# Altium PCB BOARD_4LAYER.PcbDoc (part 14 of 21)
Units mil, origin at the board's own origin, x right, y up, seen from the top; angles counter-clockwise.
Board outline 6692.91 x 10039.37 mil, 4 copper layers (Top Layer, Mid Layer 1, Mid Layer 2, Bottom Layer), stack 66.299 mil thick; 1532 components, 908 nets, 4105 pads, 1286 vias.
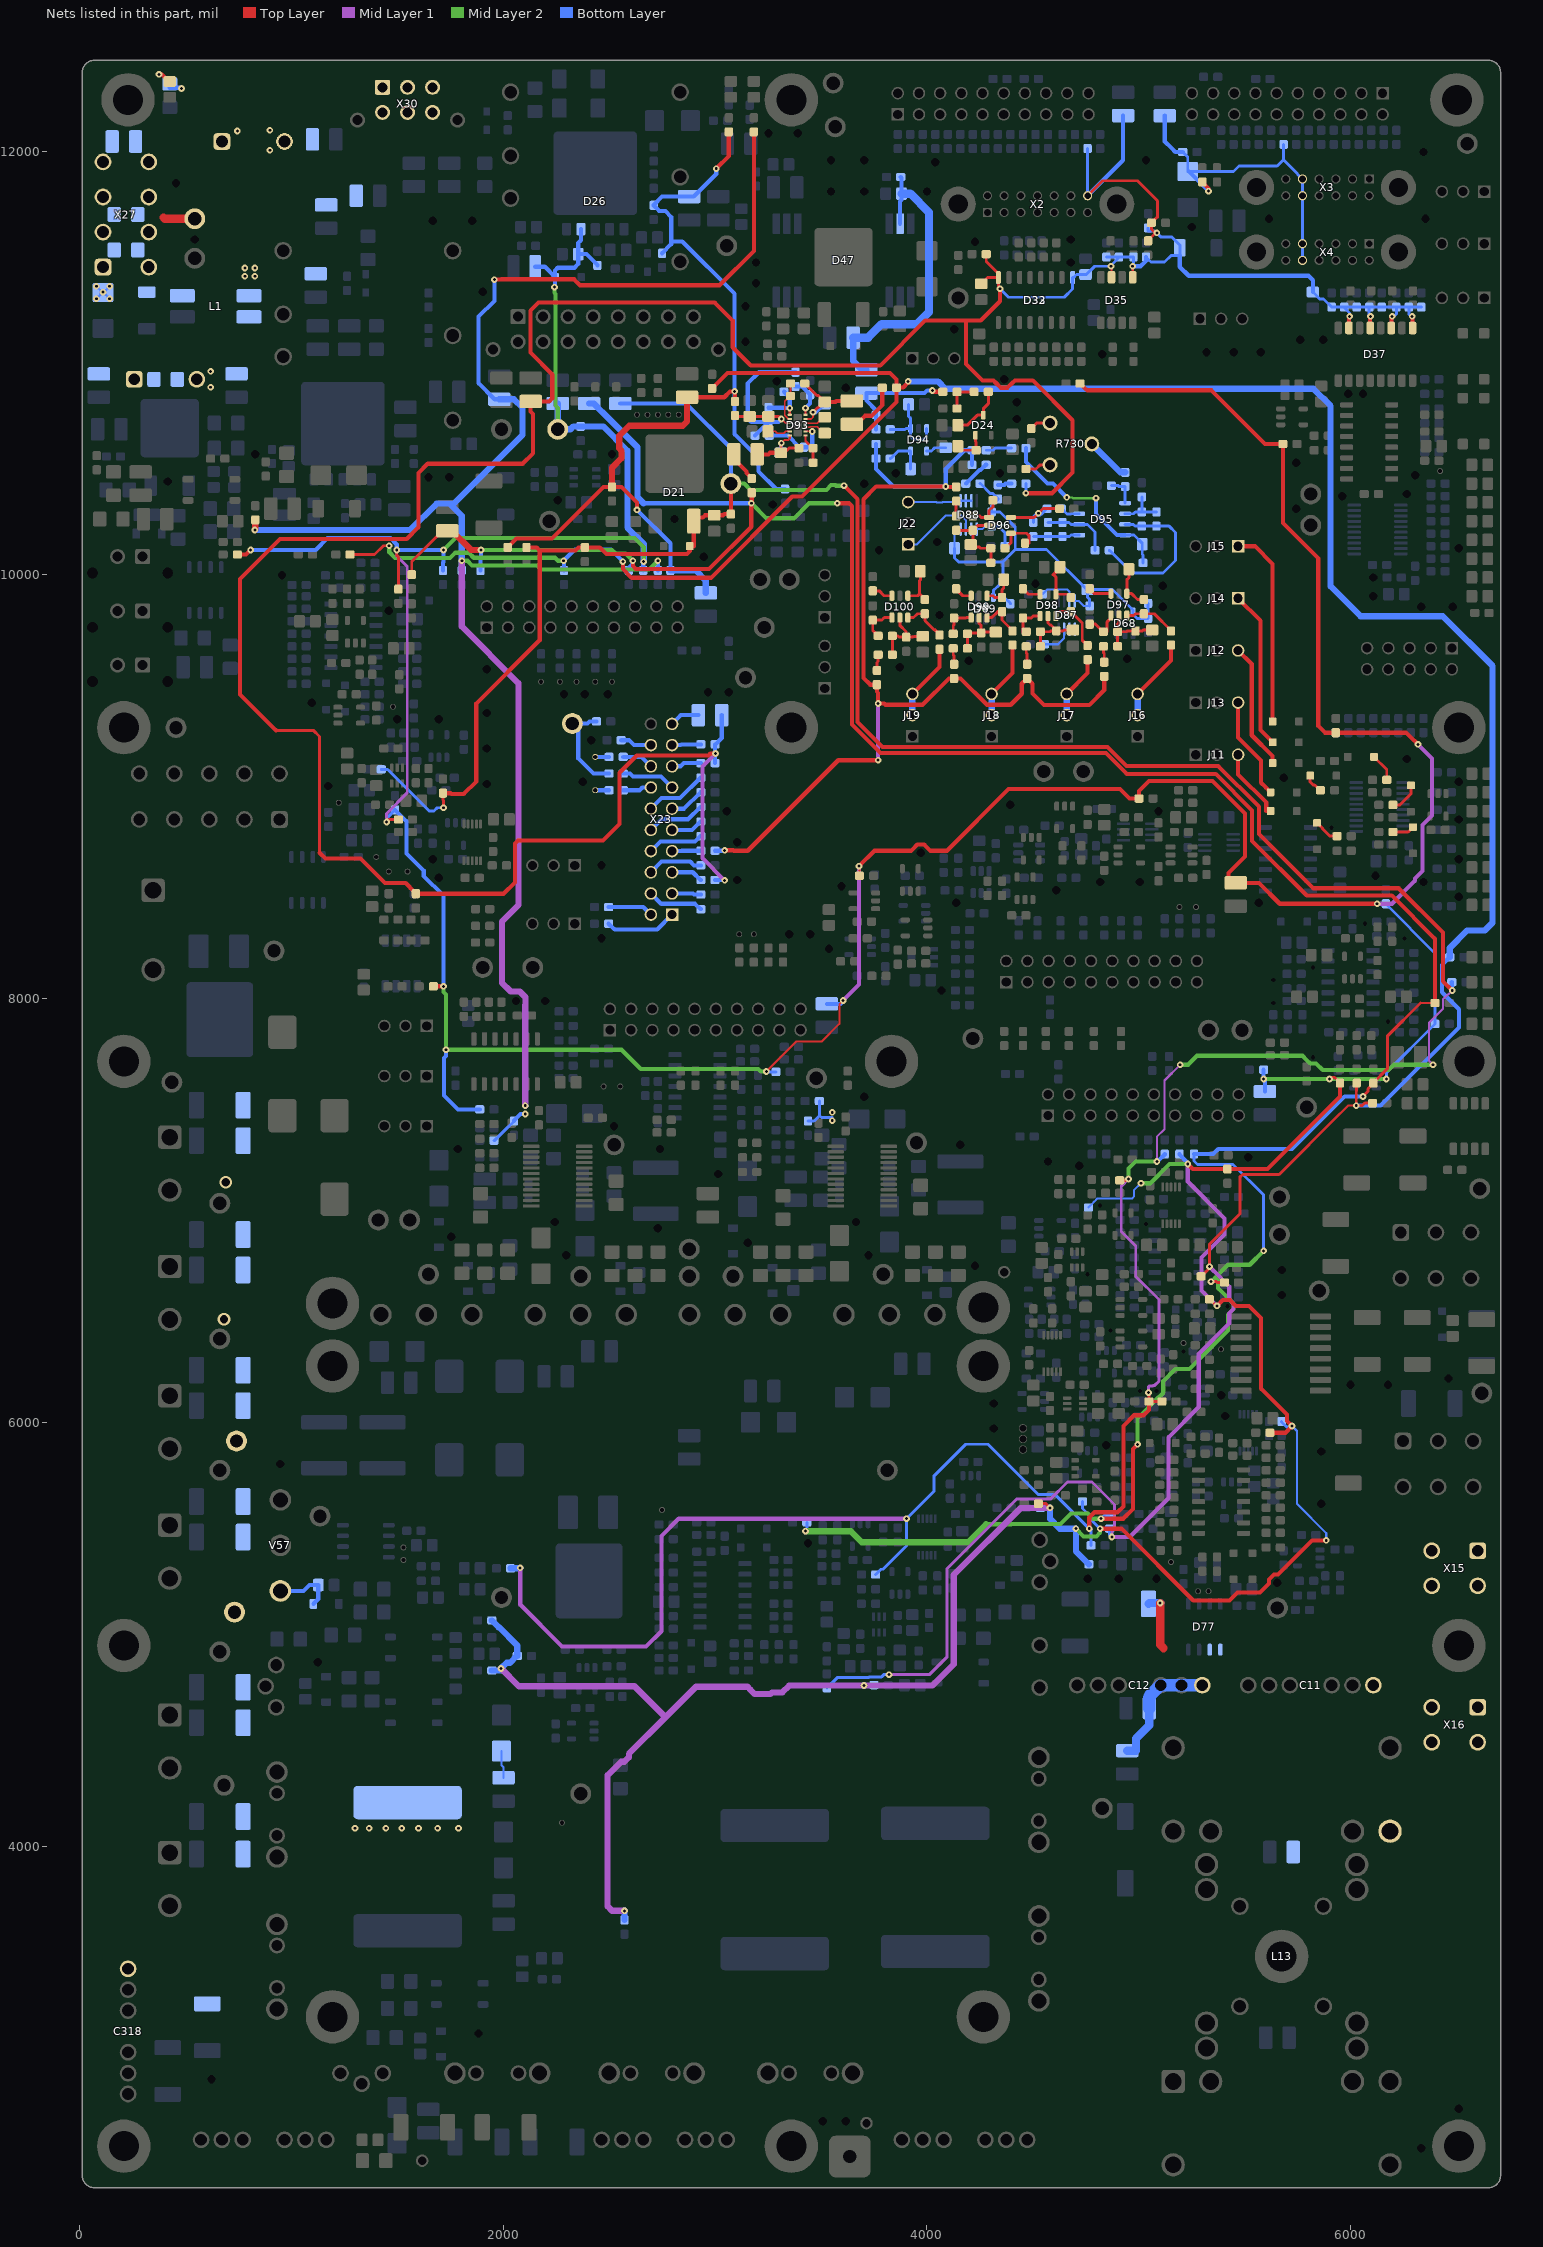
[diagram p16: the nets of this part, all layers, seen from the top]

## Via types
v1: diameter 27.56/31.5/31.5/27.56 (per signal layer), hole 13.78, Top Layer to Bottom Layer, 1270 vias
v2: diameter 59.06, hole 39.37, Top Layer to Bottom Layer, 16 vias

## Nets (pads, with @x,y where several pads share a name; then routed paths per layer and width w, separated by ;. In a path a pad name is that pad's centre, name@x,y a point inside that pad or via, vN(x,y) a via of type N, cw(c..) or ccw(c..) an arc to the next point about the centre after c; other vN are vias at no path point) (continued)
$7N3917: R101.2 V65.1 | length 103.9
  Top Layer w13.78: R101.2@6198.82,8787.4 6270.67,8787.4 V65.1@6293.31,8810.04
$7N3919: R102.2 V66.1 | length 94.1
  Top Layer w13.78: V66.1@5808.07,9053.15 5808.07,9023.54 5822.27,9009.34 5829.24,9009.34 5854.33,8984.25 R102.2@5856.3,8984.25
$7N3921: R103.2 V67.1 | length 121.9
  Top Layer w13.78: V67.1@5840.55,8829.72 5841.54,8829.72 5867.15,8804.11 5867.15,8801.16 5900.59,8767.72 R103.2@5935.04,8767.72
$7N3923: R104.2 V68.1 | length 145.7
  Top Layer w13.78: R104.2@6198.82,8915.35 6231.38,8915.35 6283.46,8967.44 V68.1@6283.46,9006.89
$7N3925: R105.2 V69.1 | length 133.1
  Top Layer w13.78: V69.1@6109.25,9141.73 6169.29,9081.69 R105.2@6169.29,9033.46
$7N4019: J15.1 V74.1 | length 940.5
  Top Layer w19.68: J15.1@5468.11,10135.83 5547.12,10135.83 5630.91,10052.04 V74.1@5630.91,9309.06
$7N4021: J14.1 V73.1 | length 746.6
  Top Layer w19.68: J14.1@5468.11,9889.76 5573.62,9784.25 5573.62,9268.9 5630.91,9211.61 V73.1@5630.91,9210.63
$7N4028: J13.3 V72.1 | length 486.6
  Top Layer w19.68: J13.3@5468.11,9397.64 5468.11,9233.32 5576.8,9124.63 5576.8,9019.66 5596.79,8999.67 5596.79,8998.68 V72.1@5621.06,8974.41
$7N4030: J12.3 V71.1 | length 598.9
  Top Layer w19.68: J12.3@5468.11,9643.7 5532.23,9579.58 5532.23,9243.88 5630.91,9145.2 V71.1@5630.91,9112.2
$7N4032: J11.3 V70.1 | length 340.8
  Top Layer w19.68: J11.3@5468.11,9151.57 5468.11,9059.22 5601.14,8926.2 5601.14,8885.83 V70.1@5621.06,8885.83
$8N34: D93.2 R724.2 R727.1 | length 193.1
  Top Layer w5.91: D93.2@3352.36,10736.22 3345.91,10736.22 3329.15,10752.98 3329.15,10819.31 3354.33,10844.49 R724.2@3356.3,10844.49
  Top Layer w7.87: R724.2@3356.3,10844.49 R727.1@3356.3,10903.54
$8N46: D93.7 R725.1 R726.2 | length 143.8
  Top Layer w10: D93.7@3427.17,10657.48 3427.17,10631.89 3460.63,10598.43 R726.2@3462.6,10598.43
  Top Layer w13.78: R725.1@3462.6,10529.53 R726.2@3462.6,10598.43
$8N62: C144.2 C145.2 D93.11 R558.2 R727.2 | length 468.9
  Top Layer w7.87: D93.11@3427.17,10736.22 3454.23,10736.22 3462.6,10744.59 v1(3462.6,10767.72)
  Top Layer w13.78: R727.2@3423.23,10903.54 3480.29,10846.48 3488.17,10846.48 C144.2@3517.72,10816.93 3513.78,10816.93 3484.23,10787.38 3482.26,10787.38 v1(3462.6,10767.72)
  Top Layer w19.68: C144.2@3517.72,10816.93 3567.91,10816.93 3571.85,10820.87 R558.2@3645.67,10820.87
  Bottom Layer w19.68: v1(3462.6,10767.72) 3474.41,10767.72 3513.78,10807.09 C145.2@3517.72,10807.09
$8N66: C147.1 C148.1 D93.6 R559.2 R726.1 | length 363.4
  Top Layer w10: v1@3311.02,10620.08 v1(3312.99,10622.05) 3327.23,10636.28 3344.94,10636.28 3352.36,10643.7 D93.6@3352.36,10657.48
  Top Layer w13.78: v1@3311.02,10620.08 C147.1@3311.02,10576.77 3327,10576.77 3348.66,10598.43 R726.1@3395.67,10598.43
  Top Layer w19.68: R559.2@3198.82,10568.9 3251.97,10568.9 3259.84,10576.77 C147.1@3311.02,10576.77
  Bottom Layer w19.68: C148.1@3311.02,10576.77 3311.02,10620.08 v1(3312.99,10622.05)
$8N130: FB77.1 R558.1 | length 263.2
  Top Layer w19.68: R558.1@3645.67,10710.63 3667.32,10710.63 3707.65,10750.96 3737.94,10750.96 3789.37,10802.39 FB77.1@3789.37,10883.86
$8N150: FB78.1 R559.1 | length 149.2
  Top Layer w19.68: R559.1@3088.58,10568.9 3088.58,10547.24 3148.14,10487.69 3148.14,10481.78 3173.23,10456.69 FB78.1@3173.23,10454.72
$8N169: C146.2 C195.1 D93.3 FB79.2 R379.2 R380.2 R381.2 | length 947
  Top Layer w5.91: 3301.18,10748.03 v1(3312.99,10736.22) 3329,10720.21 3329.52,10720.21 3333.2,10716.54 D93.3@3352.36,10716.54
  Top Layer w13.78: FB79.2@3094.49,10751.97 3098.43,10748.03 C146.2@3163.39,10748.03 C195.1@3251.97,10748.03 3301.18,10748.03
  Bottom Layer w19.68: R379.2@3188.98,10657.48 3251.97,10720.47 R381.2@3251.97,10722.44 ; v1(3312.99,10736.22) 3299.21,10722.44 R381.2@3251.97,10722.44 ; R380.2@3379.92,10956.69 3208.02,10956.69 3154.01,10902.68 3154.01,10739.18 3170.75,10722.44 R381.2@3251.97,10722.44
$8N183: C267.2 D93.9 | length 104.4
  Top Layer w5.91: D93.9@3427.17,10696.85 3446.33,10696.85 3449.28,10699.8 3483.27,10699.8 3513.78,10669.29 C267.2@3517.72,10669.29
$8N185: C267.1 D93.10 | length 102
  Top Layer w7.87: D93.10@3427.17,10716.54 3482.24,10716.54 3509.8,10744.09 C267.1@3517.72,10744.09
$8N194: C326.2 D93.5 | length 109.6
  Top Layer w5.91: C326.2@3250,10677.17 3283.72,10677.17 3292.47,10668.41 3324.44,10668.41 3333.2,10677.17 D93.5@3352.36,10677.17
$8N233: D93.1 R381.1 R537.2 | length 222
  Top Layer w10: D93.1@3352.36,10755.91 v1(3352.36,10787.4)
  Bottom Layer w19.68: R381.1@3251.97,10789.37 3325.71,10789.37 3327.68,10787.4 v1(3352.36,10787.4) 3352.36,10838.58 3326.77,10864.17 R537.2@3324.8,10864.17
$8N264: D93.12 R380.1 R538.2 | length 189.8
  Top Layer w10: D93.12@3427.17,10755.91 v1(3427.17,10787.4)
  Bottom Layer w19.68: R380.1@3379.92,10889.76 3411.42,10889.76 3448.82,10852.36 R538.2@3448.82,10850.39 3448.82,10809.06 v1(3427.17,10787.4)
$8N266: D93.8 R379.1 R539.2 | length 324.6
  Top Layer w5.91: D93.8@3427.17,10677.17 v1(3458.66,10677.17)
  Bottom Layer w19.68: R379.1@3255.91,10657.48 3343.95,10657.48 3399.07,10602.36 R539.2@3419.29,10602.36 3446.27,10602.36 3458.66,10614.75 v1(3458.66,10677.17)
$8N331: C149.2 D94.1 D94.3 FB49.2 | length 376.9
  Bottom Layer w13.78: FB49.2@3826.77,10687.01 3896.57,10687.01 3900.51,10690.94 D94.1@3923.23,10690.94 ; C149.2@3913.39,10805.12 3913.39,10749.02 3923.23,10739.17 D94.1@3923.23,10690.94 ; D94.3@3998.03,10690.94 3998.03,10653.82 3984.11,10639.9 3937.15,10639.9 3923.23,10653.82 D94.1@3923.23,10690.94
$8N334: C150.2 D94.5 FB50.1 | length 195.8
  Bottom Layer w13.78: FB50.1@3826.77,10549.21 3828.74,10549.21 3864.17,10584.65 D94.5@3923.23,10584.65 C150.2@3923.23,10500
$8N349: C327.2 D94.4 | length 97.1
  Bottom Layer w13.78: D94.4@3998.03,10584.65 4020.75,10584.65 4036.5,10600.39 C327.2@4088.58,10600.39
$8N391: C84.2 FB49.1 FB51.2 L12.2 | length 557.6
  Top Layer w19.68: v1(4025.59,10870.08) 4031.5,10864.17 FB51.2@4074.8,10864.17
  Bottom Layer w19.68: FB49.1@3759.84,10687.01 C84.2@3759.84,10755.91 3759.84,10777.26 3714.57,10822.53 L12.2@3714.57,10858.27 3989.09,10858.27 4000.91,10870.08 v1(4025.59,10870.08)
$8N428: C198.1 D24.1 R208.2 | length 178.8
  Top Layer w13.78: C198.1@4145.67,10608.27 4145.67,10588.58 R208.2@4232.28,10588.58 4232.28,10624.92 4228.35,10628.86 D24.1@4228.35,10659.45
$8N429: C151.2 D24.3 R209.1 | length 259.7
  Top Layer w13.78: C151.2@4145.67,10706.69 4190.22,10706.69 4237.46,10753.94 D24.3@4265.75,10753.94 4265.75,10784.53 4289.37,10808.15 R209.1@4289.37,10864.17
$8N430: C85.2 FB51.1 R209.2 | length 159.4
  Top Layer w13.78: C85.2@4141.73,10785.43 FB51.1@4141.73,10864.17 R209.2@4222.44,10864.17
$8N589: C328.2 D95.6 R384.2 R385.1 | length 221.9
  Bottom Layer w13.78: D95.6@4935.04,10288.98 4974.92,10288.98 4983.19,10297.24 R385.1@5013.78,10297.24 ; R384.2@5013.78,10368.11 R385.1@5013.78,10297.24 ; C328.2@5082.68,10297.24 R385.1@5013.78,10297.24
$8N592: C328.1 D95.7 R385.2 R732.1 | length 766.9
  Bottom Layer w13.78: R732.1@4860.24,10116.14 4862.2,10116.14 4969.08,10009.27 5113.61,10009.27 5173,10068.66 5173,10200 5142.69,10230.32 C328.1@5082.68,10230.32 R385.2@5013.78,10230.32 4983.19,10230.32 4974.92,10238.58 D95.7@4935.04,10238.58
$8N594: R383.2 R730.3 | length 122.3
  Top Layer w13.78: R383.2@4466.54,10500 4514.69,10500 4534.37,10519.69 R730.3@4580.71,10519.68
$8N612: R386.1 R730.2 | length 212.9
  Bottom Layer w29.53: R730.2@4777.56,10618.11 4911.42,10484.25 R386.1@4935.04,10484.25
$8N614: C86.2 D95.5 R386.2 | length 145.8
  Bottom Layer w13.78: C86.2@4870.08,10421.26 4902.64,10421.26 4904.45,10419.45 4904.45,10417.32 R386.2@4935.04,10417.32 D95.5@4935.04,10339.37
$8N619: R382.1 R730.1 | length 99.2
  Top Layer w13.78: R382.1@4492.13,10690.94 4517.72,10716.54 R730.1@4580.71,10716.54
$8N649: C87.2 C152.2 D95.8 R210.2 | length 911.3
  Mid Layer 2 w10: v1(4659.45,10366.14) 4686.1,10366.14 4690.04,10362.2 v1(4797.24,10362.2)
  Bottom Layer w13.78: D95.8@4935.04,10188.19 4977.17,10188.19 5015.75,10149.61 C152.2@5015.75,10145.67 5015.75,10098.43 5019.69,10094.49 C87.2@5019.69,10057.09
  Bottom Layer w19.68: R210.2@4466.54,10598.43 4466.54,10533.67 4569.11,10431.1 4594.49,10431.1 v1(4659.45,10366.14) ; v1(4797.24,10362.2) 4797.24,10286.93 4895.98,10188.19 D95.8@4935.04,10188.19
$8N671: FB52.1 R210.1 | length 124.3
  Bottom Layer w13.78: FB52.1@4279.53,10588.58 4312.09,10588.58 4322.08,10598.58 4366.9,10598.58 4367.05,10598.43 R210.1@4399.61,10598.43
$8N719: C329.2 D95.2 R731.1 R732.2 | length 328.1
  Bottom Layer w13.78: C329.2@4570.87,10248.03 R731.1@4639.76,10248.03 4670.35,10248.03 4679.45,10238.94 4679.45,10238.58 D95.2@4718.5,10238.58 4757.56,10238.58 4793.31,10202.83 R732.2@4793.31,10116.14
$8N721: D95.3 R121.1 | length 95.5
  Bottom Layer w13.78: R121.1@4633.86,10312.99 4635.83,10312.99 4660.92,10287.9 4678.37,10287.9 4679.45,10288.98 D95.3@4718.5,10288.98
$8N726: C329.1 D95.1 R731.2 R734.1 | length 219.5
  Bottom Layer w13.78: R734.1@4501.97,10181.1 C329.1@4570.87,10181.1 R731.2@4639.76,10181.1 4672.36,10181.1 4679.45,10188.19 D95.1@4718.5,10188.19
$8N730: D96.3 R121.2 R733.2 R734.2 | length 367.5
  Top Layer w13.78: D96.3@4396.06,10271.65 4505.91,10271.65 v1(4525.59,10291.34) 4547.24,10312.99 R733.2@4625.98,10312.99
  Bottom Layer w13.78: R734.2@4501.97,10248.03 4501.97,10275.41 4509.04,10282.48 v1@4534.45,10282.48 ; v1(4525.59,10291.34) v1@4534.45,10282.48 ; R121.2@4566.93,10312.99 4541.84,10287.9 4539.87,10287.9 v1@4534.45,10282.48
$8N738: FB53.1 R211.1 | length 70.9
  Top Layer w13.78: R211.1@4137.8,10277.56 FB53.1@4137.8,10348.43
$8N739: C88.2 C153.2 D96.5 R211.2 R306.2 R713.1 | length 413.2
  Top Layer w13.78: R211.2@4137.8,10210.63 R713.1@4216.54,10210.63 ; D96.5@4292.91,10234.25 4240.16,10234.25 R713.1@4216.54,10210.63 ; C88.2@4301.18,10057.09 R306.2@4301.18,10125.98 4253.55,10125.98 4247.13,10132.41 4206.69,10132.41 C153.2@4206.69,10143.7 4216.54,10153.54 R713.1@4216.54,10210.63
$8N764: D96.1 R122.1 R306.1 | length 229.4
  Top Layer w13.78: R306.1@4368.11,10125.98 4370.08,10125.98 4396.06,10151.97 D96.1@4396.06,10196.85 4470.18,10196.85 4482.14,10184.89 4482.14,10149.61 R122.1@4462.6,10149.61
$8N798: D96.4 R713.2 R735.2 | length 167
  Top Layer w13.78: R713.2@4216.54,10277.56 4249.02,10277.56 4254.92,10271.65 D96.4@4292.91,10271.65 4292.91,10303.66 4311.02,10321.77 R735.2@4311.02,10352.36
$8N882: D97.3 R742.2 | length 110
  Top Layer w13.78: R742.2@4767.72,9935.04 4790.94,9911.81 D97.3@4868.11,9911.81
$8N885: C268.2 D97.1 R741.1 | length 212.7
  Top Layer w13.78: C268.2@4952.76,10027.56 4952.76,9987.13 4942.91,9977.28 D97.1@4942.91,9911.81 4966.02,9911.81 4993.03,9884.8 4993.03,9883.86 R741.1@5023.62,9883.86
$8N894: D97.6 R307.1 R741.2 | length 246.7
  Top Layer w13.78: D97.6@4942.91,9808.66 4975.39,9808.66 4983.66,9816.93 R741.2@5023.62,9816.93 5072.83,9816.93 5151.57,9738.19 R307.1@5151.57,9736.22
$8N898: D97.4 R714.2 R736.2 | length 181
  Top Layer w13.78: R714.2@4767.72,9767.72 4795.28,9767.72 4830.71,9732.28 R736.2@4832.68,9732.28 4850.31,9732.28 4850.31,9779.05 4868.11,9796.85 D97.4@4868.11,9808.66
$8N905: C89.2 C154.2 D97.5 R212.2 R736.1 | length 314.4
  Top Layer w13.78: R212.2@4899.61,9663.39 R736.1@4899.61,9732.28 ; D97.5@4905.51,9808.66 4905.51,9773.74 4899.61,9767.83 R736.1@4899.61,9732.28 ; C154.2@5062.99,9740.16 5020.67,9740.16 5016.73,9736.22 C89.2@4984.25,9736.22 4944.88,9736.22 4940.94,9732.28 R736.1@4899.61,9732.28
$8N909: FB54.1 R212.1 | length 76.4
  Top Layer w13.78: R212.1@4832.68,9663.39 4832.68,9632.8 4836.61,9628.86 FB54.1@4836.61,9588.58
$8N946: J16.2 J16.3 R307.2 | length 395.9
  Top Layer w19.68: J16.3@4994.09,9438.58 5151.57,9596.06 R307.2@5151.57,9669.29
  Bottom Layer w29.53: J16.2@4994.09,9338.58 J16.3@4994.09,9438.58
$8N986: D98.3 R744.2 | length 91.5
  Top Layer w13.78: R744.2@4452.76,9935.04 4478.74,9909.06 D98.3@4533.46,9909.06
$8N987: C269.2 D98.1 R749.1 | length 234.8
  Top Layer w13.78: C269.2@4627.95,10037.4 4627.95,10033.46 4595.62,10001.13 4601.67,9995.08 4604.35,9995.08 4608.27,9991.16 D98.1@4608.27,9909.06 4679.13,9909.06 R749.1@4679.13,9893.7
$8N988: D98.4 R737.2 R740.2 | length 165
  Top Layer w13.78: R740.2@4468.5,9732.28 4452.76,9732.28 R737.2@4452.76,9797.24 4492.52,9797.24 4501.18,9805.91 D98.4@4533.46,9805.91
$8N992: FB55.1 R213.1 | length 86.3
  Top Layer w13.78: R213.1@4468.5,9663.39 4468.5,9632.8 4472.44,9628.86 FB55.1@4472.44,9578.74
$8N995: C90.2 C155.2 D98.5 R213.2 R740.1 | length 313.9
  Top Layer w13.78: R213.2@4535.43,9663.39 R740.1@4535.43,9732.28 4579.65,9732.28 4583.58,9736.22 C90.2@4610.24,9736.22 ; D98.5@4570.87,9805.91 4570.87,9773.74 4581.33,9763.28 4585.15,9763.28 4610.24,9738.19 C90.2@4610.24,9736.22 ; C155.2@4688.98,9740.16 4646.65,9740.16 4642.72,9736.22 C90.2@4610.24,9736.22
$8N998: D98.6 R308.1 R749.2 | length 283.8
  Top Layer w13.78: D98.6@4608.27,9805.91 4608.27,9826.77 R749.2@4679.13,9826.77 4732.78,9773.12 4732.78,9692.41 R308.1@4757.87,9667.32
$8N999: J17.2 J17.3 R308.2 | length 302.6
  Top Layer w19.68: J17.3@4659.45,9438.58 4757.87,9537.01 R308.2@4757.87,9600.39
  Bottom Layer w29.53: J17.2@4659.45,9338.58 J17.3@4659.45,9438.58
$8N1141: D99.3 R747.2 | length 85.7
  Top Layer w13.78: R747.2@4137.8,9935.04 4137.8,9933.07 4168.9,9901.97 D99.3@4208.66,9901.97
$8N1142: C270.2 D99.1 R743.1 | length 162.2
  Top Layer w13.78: D99.1@4283.46,9901.97 4311.02,9901.97 4319.29,9893.7 R743.1@4354.33,9893.7 4354.33,9930.04 4362.2,9937.91 C270.2@4362.2,9978.35
$8N1143: D99.4 R738.2 R745.2 | length 157.8
  Top Layer w13.78: R745.2@4124.02,9722.44 4124.02,9760.75 4127.95,9764.68 R738.2@4127.95,9797.24 4183.98,9797.24 4185.55,9798.82 D99.4@4208.66,9798.82
$8N1145: FB56.1 R214.1 | length 76.4
  Top Layer w13.78: R214.1@4124.02,9653.54 4124.02,9622.95 4127.95,9619.02 FB56.1@4127.95,9578.74
$8N1147: C91.2 C156.2 D99.5 R214.2 R745.1 | length 282.5
  Top Layer w13.78: R214.2@4190.94,9653.54 R745.1@4190.94,9722.44 4194.88,9726.38 C91.2@4255.91,9726.38 ; D99.5@4246.06,9798.82 4246.06,9771.85 4255.91,9762.01 C91.2@4255.91,9726.38 ; C156.2@4324.8,9730.32 4259.84,9730.32 C91.2@4255.91,9726.38
$8N1148: D99.6 R309.1 R743.2 | length 193.4
  Top Layer w13.78: D99.6@4283.46,9798.82 4305.53,9798.82 4333.48,9826.77 R743.2@4354.33,9826.77 4354.33,9787.4 4403.54,9738.19 R309.1@4403.54,9736.22
$8N1149: J18.2 J18.3 R309.2 | length 371.5
  Top Layer w19.68: J18.3@4305.12,9438.58 4403.54,9537.01 R309.2@4403.54,9669.29
  Bottom Layer w29.53: J18.2@4305.12,9338.58 J18.3@4305.12,9438.58
$8N1266: D100.3 R750.2 | length 100.2
  Top Layer w13.78: R750.2@3744.09,9925.2 3774.68,9925.2 3797.91,9901.97 D100.3@3834.65,9901.97
$8N1267: C271.2 D100.1 R748.1 | length 205
  Top Layer w13.78: D100.1@3909.45,9901.97 3956.12,9901.97 3965.07,9910.92 ; C271.2@3968.5,10017.72 3968.5,9977.28 3965.07,9973.85 3965.07,9910.92 ; R748.1@3990.16,9883.86 3990.16,9885.83 3965.07,9910.92
$8N1268: D100.4 R739.2 R746.2 | length 180.7
  Top Layer w13.78: R746.2@3769.68,9712.6 3744.09,9738.19 R739.2@3744.09,9787.4 3787.4,9787.4 3798.82,9798.82 D100.4@3834.65,9798.82
$8N1270: FB57.1 R215.1 | length 77.2
  Top Layer w13.78: FB57.1@3763.78,9549.21 3763.78,9587.52 3769.68,9593.43 R215.1@3769.68,9624.02
$8N1272: C92.2 C157.2 D100.5 R215.2 R746.1 | length 340.7
  Top Layer w13.78: R215.2@3836.61,9624.02 R746.1@3836.61,9712.6 3863.27,9712.6 3869.17,9706.69 C92.2@3901.57,9706.69 ; D100.5@3872.05,9798.82 3872.05,9762.41 3901.57,9732.89 C92.2@3901.57,9706.69 ; C157.2@3980.32,9710.63 3937.99,9710.63 3934.06,9706.69 C92.2@3901.57,9706.69
$8N1273: D100.6 R310.1 R748.2 | length 218.9
  Top Layer w13.78: D100.6@3909.45,9798.82 3937.01,9798.82 3955.12,9816.93 R748.2@3990.16,9816.93 3990.16,9784.37 4030.93,9743.59 4033.96,9743.59 4059.06,9718.5 R310.1@4059.06,9716.54
$8N1274: J19.2 J19.3 R310.2 | length 364
  Top Layer w19.68: J19.3@3931.1,9438.58 4059.06,9566.54 R310.2@4059.06,9649.61
  Bottom Layer w29.53: J19.2@3931.1,9338.58 J19.3@3931.1,9438.58
$8N1420: C93.2 C94.2 C158.2 C159.2 D68.5 D69.5 D87.8 D88.8 R216.2 R541.2 R751.2 R752.2 R753.2 R754.2 | length 2200.2
  Bottom Layer w10: C158.2@4129.92,10125.98 4129.92,10204.8 4141.65,10216.54 D88.8@4158.46,10216.54 ; D87.8@4697.83,9877.95 4714.65,9877.95 4738.27,9854.33 R751.2@4767.72,9854.33
  Bottom Layer w13.78: C158.2@4129.92,10125.98 4129.92,10080.68 4148.65,10061.95 4358.27,10061.95 ; R541.2@4250,10431.1 4251.97,10431.1 4297.74,10385.33 4309.56,10385.33 4334.65,10360.24 R216.2@4334.65,10358.27 4334.65,10356.3 4305.12,10326.77 R753.2@4305.12,10297.24 4345.01,10297.24 4416.7,10225.55 4416.7,10120.39 ; R754.2@4393.7,9864.17 4393.7,9866.14 4366.14,9893.7 D69.5@4312.99,9893.7 4312.99,9926.26 4330.15,9943.41 4331.21,9943.41 4356.3,9968.5 C93.2@4358.27,9968.5 4358.27,10061.95 ; R751.2@4767.72,9854.33 4767.72,9886.89 4765.59,9886.89 4757.87,9894.61 C159.2@4757.87,9931.1 ; C94.2@5043.31,9866.14 R752.2@5043.31,9795.28 4992.13,9795.28 4972.44,9814.96 D68.5@4972.44,9824.8 4972.44,9834.65 4875.98,9931.1 C159.2@4757.87,9931.1 ; 4358.27,10061.95 4416.7,10120.39 ; 4416.7,10120.39 4564.65,10120.39 4753.94,9931.1 C159.2@4757.87,9931.1
$8N1633: D87.1 D87.2 D87.3 R540.1 | length 196.9
  Bottom Layer w10: R540.1@4555.12,9673.23 4618.19,9673.23 4646.65,9701.69 D87.3@4646.65,9744.09 D87.2@4672.24,9744.09 D87.1@4697.83,9744.09
$8N1652: D87.7 R123.1 | length 183
  Bottom Layer w10: R123.1@4545.28,9909.45 4567.22,9931.39 4661.21,9931.39 4672.24,9920.35 D87.7@4672.24,9877.95
$8N1679: D88.5 D88.6 R124.2 R753.1 | length 240.7
  Bottom Layer w10: D88.6@4209.65,10216.54 D88.5@4235.24,10216.54 4260.75,10216.54 4274.53,10230.32 R753.1@4305.12,10230.32
  Bottom Layer w13.78: R753.1@4305.12,10230.32 4337.43,10230.32 4368.11,10199.64 R124.2@4368.11,10135.83
$8N1733: D88.1 D88.2 D88.3 J22.3 | length 303
  Bottom Layer w10: J22.3@3911.42,10344.09 4043.75,10344.09 4046.38,10341.46 4071.73,10341.46 4074.36,10344.09 4135.35,10344.09 4141.65,10350.39 D88.1@4158.46,10350.39 D88.2@4184.06,10350.39 D88.3@4209.65,10350.39
$8N1746: D88.7 J22.1 | length 379.8
  Bottom Layer w10: J22.1@3911.42,10144.09 3951.85,10144.09 4087.48,10279.72 4163.27,10279.72 4184.06,10258.94 D88.7@4184.06,10216.54
$8N1752: FB58.1 R216.1 | length 67.4
  Bottom Layer w19.68: R216.1@4334.65,10425.2 4365.24,10425.2 4371.14,10431.1 FB58.1@4399.61,10431.1
$8N1834: FB59.1 R541.1 | length 133.1
  Bottom Layer w10: R541.1@4183.07,10431.1 R541.1@4185.04,10431.1
  Bottom Layer w19.68: R541.1@4185.04,10431.1 4248.53,10494.59 4252.47,10494.59 4277.56,10519.68 FB59.1@4279.53,10519.68
$8N1881: R560.1 X23.19 | length 141.1
  Bottom Layer w19.68: X23.19@2797.24,9297.24 2838.58,9338.58 R560.1@2921.26,9338.58
$8N1882: R631.1 X23.14 | length 135.7
  Bottom Layer w19.68: R631.1@2566.93,8984.25 2643.82,8984.25 2656.81,8997.24 X23.14@2697.24,8997.24
$8N1883: R173.1 X23.15 | length 142
  Bottom Layer w19.68: X23.15@2797.24,9097.24 2837.68,9097.24 2852.64,9112.2 R173.1@2933.07,9112.2
$8N1884: R174.1 X23.16 | length 148.7
  Bottom Layer w19.68: R174.1@2566.93,9141.73 2652.76,9141.73 X23.16@2697.24,9097.24
$8N1885: R172.1 X23.17 | length 137.3
  Bottom Layer w19.68: X23.17@2797.24,9197.24 2837.68,9197.24 2841.22,9200.79 R172.1@2933.07,9200.79
$8N1886: R125.1 X23.18 | length 149.8
  Bottom Layer w19.68: R125.1@2557.09,9220.47 2594.49,9220.47 2617.72,9197.24 X23.18@2697.24,9197.24
$8N1888: R510.2 X23.13 | length 257.5
  Bottom Layer w19.68: R510.2@2566.93,9062.99 2599.49,9062.99 2613.43,9049.05 2745.44,9049.05 X23.13@2797.24,8997.24
$8N1889: C246.1 R510.1 TP42.1 | length 469.5
  Bottom Layer w19.68: C246.1@2440.94,9309.06 2408.39,9309.06 2398.54,9299.21 TP42.1@2326.77,9299.21 2354.92,9271.07 2354.92,9134.25 2426.18,9062.99 R510.1@2500,9062.99
$8N1897: OSC32.1 R631.2 | length 65
  Bottom Layer w19.68: OSC32.1@2435.04,8984.25 R631.2@2500,8984.25
$8N1898: OSC33.1 R174.2 | length 65
  Bottom Layer w19.68: OSC33.1@2435.04,9141.73 R174.2@2500,9141.73
$8N1907: R509.2 X23.1 | length 339.3
  Bottom Layer w19.68: R509.2@2498.03,8354.33 2523.12,8329.24 2525.09,8329.24 2526.88,8327.45 2727.45,8327.45 X23.1@2797.24,8397.24
$8N1908: R507.2 X23.3 | length 137.9
  Bottom Layer w19.68: X23.3@2797.24,8497.24 2895.39,8497.24 2900.51,8492.13 R507.2@2933.07,8492.13
$8N1914: R513.2 X23.2 | length 214.1
  Bottom Layer w19.68: R513.2@2498.03,8433.07 2661.42,8433.07 X23.2@2697.24,8397.24
$8N1918: R514.2 X23.4 | length 266.5
  Bottom Layer w19.68: X23.4@2697.24,8497.24 2746.17,8448.32 2906.01,8448.32 2931.1,8423.23 R514.2@2933.07,8423.23
$8N1922: R515.2 X23.6 | length 263.9
  Bottom Layer w19.68: X23.6@2697.24,8597.24 2747.49,8647.49 2882.95,8647.49 2900.51,8629.92 R515.2@2933.07,8629.92
$8N2150: R508.2 X23.12 | length 296.3
  Bottom Layer w19.68: X23.12@2697.24,8897.24 2747.24,8947.24 2835.04,8947.24 2931.1,9043.31 R508.2@2933.07,9043.31
$8N2151: R630.1 X23.11 | length 167.8
  Bottom Layer w19.68: X23.11@2797.24,8897.24 2853.94,8897.24 2931.1,8974.41 R630.1@2933.07,8974.41
$8N2152: R516.2 X23.10 | length 280.7
  Bottom Layer w19.68: X23.10@2697.24,8797.24 2747.24,8847.24 2872.83,8847.24 2931.1,8905.51 R516.2@2933.07,8905.51
$8N2153: R518.2 X23.8 | length 265
  Bottom Layer w19.68: X23.8@2697.24,8697.24 2742.63,8742.63 2906.01,8742.63 2931.1,8767.72 R518.2@2933.07,8767.72
$8N2154: R512.2 X23.5 | length 150.8
  Bottom Layer w19.68: X23.5@2797.24,8597.24 2894.88,8597.24 2931.1,8561.02 R512.2@2933.07,8561.02
$8N2155: R511.2 X23.7 | length 136.5
  Bottom Layer w19.68: X23.7@2797.24,8697.24 2842.52,8697.24 2844.09,8698.82 R511.2@2933.07,8698.82
$8N2156: R517.2 X23.9 | length 152.1
  Bottom Layer w19.68: X23.9@2797.24,8797.24 2891.73,8797.24 2931.1,8836.61 R517.2@2933.07,8836.61
+3V0: C83.2 FB50.2 FB52.2 FB53.2 FB54.2 FB55.2 FB56.2 FB57.2 FB59.2 R511.1 | length 4907.2
  Top Layer w19.68: v1(3045.28,8700.79) 3085.83,8700.79 3087.96,8698.66 3154.2,8698.66 3581.52,9125.98 v1(3769.68,9125.98) ; FB53.2@4137.8,10415.35 4090.55,10415.35 v1(4088.58,10417.32) 3760.41,10417.32 3700.55,10357.46 3700.55,9513.87 3732.14,9482.28 FB57.2@3763.78,9482.28 3763.78,9449.72 3769.68,9443.82 v1(3769.68,9393.7) 3798.35,9393.7 3804.54,9387.51 3979.3,9387.51 4103.6,9511.81 FB56.2@4127.95,9511.81 4158.54,9511.81 4282.6,9387.75 4395.52,9387.75 4447.35,9439.58 4447.35,9486.72 FB55.2@4472.44,9511.81 4497.53,9486.72 4497.53,9441.17 4551.99,9386.71 4765.95,9386.71 4836.61,9457.38 FB54.2@4836.61,9521.65
  Mid Layer 1 w19.68: v1(3769.68,9125.98) v1(3769.68,9393.7)
  Bottom Layer w19.68: R511.1@3000,8698.82 3043.31,8698.82 v1(3045.28,8700.79) ; C83.2@3759.84,10618.11 FB50.2@3759.84,10549.21 3759.84,10499.46 3841.98,10417.32 v1(4088.58,10417.32) 4088.58,10500.38 4176.78,10588.58 FB52.2@4212.6,10588.58 FB59.2@4212.6,10519.68
+3V3: C51.2 C122.2 D21.3 FB5.2 FB9.1 FB11.2 FB15.1 FB20.2 FB30.2 FB34.1 FB40.2 R472.1 R551.2 R627.2 R628.1 R629.2 TP24.1 V13.2 | length 17964.8
  Top Layer w13.78: FB5.2@1716.54,8970.47 1716.54,8937.91 1718.5,8935.94 v1(1718.5,8901.57) ; FB20.2@4909.45,7143.7 4944.88,7143.7 v1(4950.79,7149.61) ; v1(5045.28,6141.73) 5047.24,6139.76 FB40.2@5047.24,6100.39 FB11.2@5108.27,6100.39
  Top Layer w19.68: FB5.2@1716.54,8970.47 1751.97,8970.47 1756.24,8966.21 1814.05,8966.21 1873.58,9025.74 1873.58,9392.86 2172.6,9691.88 2172.6,10116.01 ; R472.1@2110.24,10129.92 2158.69,10129.92 2172.6,10116.01 ; TP24.1@3074.8,10431.1 C51.2@3074.8,10287.4 3043.31,10287.4 3037.4,10281.5 C122.2@2996.06,10281.5 2952.32,10281.5 2942.01,10271.19 2899.61,10271.19 D21.3@2899.61,10253.94 2899.61,10135.83 V13.2@2880.91,10135.83 2880.91,10112.63 2866.99,10098.71 2487.43,10098.71 2456.22,10129.92 R629.2@2385.83,10129.92 2355.24,10129.92 2341.37,10116.06 2172.65,10116.06 2172.6,10116.01 ; v1(3608.27,10421.26) 3672,10357.53 3672,9306.41 3789.94,9188.46 4852.53,9188.46 4942.13,9098.86 5374.11,9098.86 5566.23,8906.74 5566.23,8778.26 5823,8521.5 6225.99,8521.5 6435.04,8312.45 6435.04,8082.68 v1(6478.35,8039.37) ; v1(4765.75,5500) 4765.75,5552.86 4790.34,5577.45 4899.14,5577.45 4926.98,5605.29 4926.98,5984.48 4977.57,6035.08 5021.96,6035.08 5047.24,6060.36 FB40.2@5047.24,6100.39
  Mid Layer 1 w10: v1(5084.65,7232.28) 5084.65,7349.09 5120.87,7385.31 5120.87,7614.96 v1(5194.88,7688.98) ; v1(6387.8,7688.98) 6368.95,7707.82 6368.95,7887.17 6435.04,7953.26 6435.04,7998.57 6456.99,8020.52 6459.5,8020.52 v1(6478.35,8039.37)
  Mid Layer 1 w13.78: v1(4950.79,7149.61) 4916.76,7115.58 4916.76,6901.65 4985.12,6833.29 4985.12,6690.5 5094.71,6580.91 5094.7,6195.83 5075.22,6176.34 5068.37,6176.34 5064.27,6172.24 5047.24,6172.24 5045.28,6170.28 v1(5045.28,6141.73)
  Mid Layer 1 w19.68: v1(2080.71,5314.96) 2080.71,5141.41 2278.22,4943.9 2674.53,4943.9 2746.77,5016.14 2746.77,5465.12 2828.89,5547.24 v1(3903.54,5547.24)
  Mid Layer 2 w19.68: TP24.1@3074.8,10431.1 3137.77,10431.1 3167.41,10401.46 3525.21,10401.46 3547.79,10424.04 3567.79,10424.04 3570.57,10421.26 v1(3608.27,10421.26) ; v1(4950.79,7149.61) 4950.79,7199.45 4983.62,7232.28 v1(5084.65,7232.28) ; v1(5194.88,7688.98) 5232.45,7688.98 5274.85,7731.38 5771.92,7731.38 5791.18,7712.11 5808.57,7694.72 5833.16,7694.72 5836.35,7694.72 5867.5,7663.57 6178.37,7663.57 6203.92,7689.13 6285.75,7689.13 6285.9,7688.98 v1(6387.8,7688.98)
  Bottom Layer w13.78: FB9.1@1425.2,9082.68 1455.44,9082.68 1651.58,8886.53 1674.12,8886.53 1689.16,8901.57 v1(1718.5,8901.57) ; FB30.2@3757.87,5283.46 3782.96,5308.55 3792.83,5308.55 3903.54,5419.27 v1(3903.54,5547.24) 4034.09,5677.79 4034.09,5749.65 4182.81,5898.37 4288.58,5898.37 4526.61,5660.34 4605.41,5660.34 v1(4765.75,5500) 4771.95,5500 4773.62,5498.33 FB15.1@4773.62,5421.26
  Bottom Layer w19.68: R551.2@2553.15,10809.06 2863.52,10809.06 3074.8,10597.77 TP24.1@3074.8,10431.1 ; v1(5084.65,7232.28) 5088.58,7232.28 5122.05,7265.75 R627.2@5122.05,7267.72 ; R628.1@6476.38,8078.74 6476.38,8041.34 v1(6478.35,8039.37)
  Bottom Layer w29.53: FB34.1@2035.43,5312.99 2078.74,5312.99 v1(2080.71,5314.96)
+5V: FB7.1 FB13.1 FB21.1 FB24.1 FB28.1 FB32.1 FB77.2 R76.1 R151.2 R484.1 | length 15862.3
  Top Layer w10: 5946.97,7456.69 5986.35,7496.06 v1(6025.59,7496.06)
  Top Layer w13.78: FB7.1@1277.56,10096.46 1393.7,10096.46 1435.04,10137.8 v1(1462.6,10137.8) ; FB24.1@5293.31,6690.94 5295.28,6690.94 5332.68,6728.35 v1(5332.68,6736.22) 5332.68,6842.39 5477.94,6987.66 5477.94,7160.73 5488.83,7171.62 5661.9,7171.62 5946.97,7456.69 ; FB21.1@6027.56,7602.36 6027.56,7567.91 6025.59,7565.94 v1(6025.59,7496.06) 6054.13,7496.06 6065.94,7507.87 FB28.1@6102.36,7507.87
  Top Layer w19.68: v1(2564.96,10062.99) 2564.96,10028.37 2606.78,9986.56 2981.43,9986.56 3364.53,10369.66 3409.56,10369.66 3856.3,10816.4 FB77.2@3856.3,10883.86 ; R76.1@2986.22,10879.92 3059.01,10952.71 3274.77,10952.71 3274.97,10952.91 3307.71,10952.91 3307.91,10952.71 3825.66,10952.71 3856.3,10922.08 FB77.2@3856.3,10883.86 ; v1(3911.42,10913.39) 3911.42,10907.22 3888.06,10883.86 FB77.2@3856.3,10883.86
  Mid Layer 1 w13.78: v1(3820.87,4811.02) 4011.19,4811.02 4095.38,4895.22 4095.38,5312.2 4422.46,5639.27 4581.62,5639.27 4662.82,5720.47 4778.14,5720.47 4884.52,5614.09 4884.52,5499.76 4872.05,5487.28 v1(4872.05,5460.63)
  Mid Layer 1 w19.68: v1(4872.05,5460.63) 4957,5460.63 5139.76,5643.39 5139.76,5931.1 5282.48,6073.82 5282.48,6324.9 5425.97,6468.39 5425.97,6515.88 5429.62,6519.53 5447.01,6536.92 5447.01,6561.51 5429.62,6578.9 5425.97,6582.55 5425.97,6643.28 5355.97,6713.28 5355.62,6713.28 v1(5332.68,6736.22)
  Mid Layer 2 w19.68: v1(1462.6,10137.8) 1462.6,10107.52 1490.45,10079.67 1748.96,10079.67 1773.92,10104.62 1838.29,10104.62 1861.54,10081.37 2244.34,10081.37 2258.78,10066.93 v1(2285.43,10066.93)
  Bottom Layer w10: v1@4870.98,5460.63 v1(4872.05,5460.63)
  Bottom Layer w13.78: FB32.1@3527.56,4748.03 3576.37,4796.84 3724.97,4796.84 3729.26,4801.13 3786.28,4801.13 3796.18,4811.02 v1(3820.87,4811.02) ; FB13.1@4862.2,5500 4862.2,5469.41 v1@4870.98,5460.63
  Bottom Layer w19.68: R484.1@2287.4,10021.65 2287.4,10062.99 2285.43,10062.99 v1(2285.43,10066.93) 2338.07,10119.57 2508.38,10119.57 v1(2564.96,10062.99) ; v1(6025.59,7496.06) 6140.8,7496.06 6510.1,7865.36 6510.1,7951.12 6430.1,8031.11 6430.1,8160.42 6438.14,8168.46 6438.14,8170.42 6440.11,8170.42 R151.2@6466.54,8196.85
  Bottom Layer w29.53: v1(3911.42,10913.39) 4052.11,10913.39 4086.91,10878.58 5823.61,10878.58 5904.53,10797.66 5904.53,9947.03 6045.92,9805.64 6433.59,9805.64 6668.46,9570.77 6668.46,8358.37 6632.91,8322.82 6549.52,8322.82 6466.54,8239.83 R151.2@6466.54,8196.85
+5V5: C50.2 FB18.2 FB65.1 FB75.1 FB79.1 L4.2 R145.2 R148.2 R466.1 R549.2 R556.2 | length 4724.6
  Top Layer w19.68: R466.1@2021.65,10129.92 2046.74,10155.01 2046.74,10156.98 2062.29,10172.53 2230.34,10172.53 2473.16,10415.35 FB65.1@2513.78,10415.35 2558.53,10415.35 2631.89,10342 v1(2631.89,10307.09) ; R549.2@2868.11,10838.58 3043.62,10838.58 3071.18,10866.14 v1(3092.52,10866.14) 3094.49,10864.17 FB79.1@3094.49,10818.9 ; v1(3005.91,11917.32) 3064.96,11976.38 R145.2@3064.96,12090.55
  Top Layer w29.53: FB65.1@2513.78,10415.35 2513.78,10506.04 2558.23,10550.49 2558.23,10587.31 2547.87,10597.66 2547.87,10656.72 2595.09,10703.93 2847.22,10703.93 2868.11,10724.83 R549.2@2868.11,10838.58
  Bottom Layer w19.68: v1(2631.89,10307.09) 2789.37,10149.61 R148.2@2789.37,10021.65 ; C50.2@2750,11517.72 2793.1,11560.82 2793.1,11574.18 ; v1(3005.91,11917.32) 3005.91,11891.73 2899.61,11785.43 L4.2@2877.95,11785.43 2750,11785.43 2710.63,11746.06 FB75.1@2710.63,11744.09 2735.72,11719 2735.72,11717.04 2765.5,11717.04 2793.1,11689.43 2793.1,11574.18 ; FB18.2@3330.71,10405.51 3288.63,10405.51 3204.96,10489.18 3204.96,10551.88 3092.52,10664.32 v1(3092.52,10866.14) 3092.52,11327.17 2845.5,11574.18 2793.1,11574.18
  Bottom Layer w29.53: R148.2@2789.37,10021.65 2908.67,10021.65 2956.69,9973.63 R556.2@2956.69,9915.35
+5V5_UM: C36.2 C119.2 D47.13 L5.1 L12.1 | length 1460.7
  Bottom Layer w19.68: D47.13@3873.23,11657.48 3873.23,11762.99 3879.92,11769.68 C119.2@3879.92,11799.21 3879.92,11874.02 C36.2@3875.98,11877.95
  Bottom Layer w29.53: L5.1@3651.57,11120.08 3651.57,11009.84 3692.91,10968.5 L12.1@3714.57,10968.5
  Bottom Layer w39.37: L5.1@3651.57,11120.08 3722.54,11120.08 3786.26,11183.8 3953.85,11183.8 4009.9,11239.85 4009.9,11710.8 3921.49,11799.21 C119.2@3879.92,11799.21
+5V_PS: C43.2 R428.1 R542.2 R617.2 V27.2 X3.5 X3.11 X4.5 X4.11 | length 1575.1
  Top Layer w10: C43.2@5299.21,11852.36 C43.2@5299.21,11854.33
  Top Layer w19.68: C43.2@5299.21,11852.36 5328.74,11822.83 v1(5328.74,11811.02)
  Bottom Layer w10: V27.2@5230.31,11903.54 V27.2@5236.22,11903.54
  Bottom Layer w13.78: R617.2@5206.69,11996.06 5230.31,11972.44 V27.2@5230.31,11903.54 ; V27.2@5236.22,11903.54 5446.39,11903.54 5472.13,11929.28 5652.45,11929.28 5681.42,11958.24 5683.07,11958.24 ; R428.1@5683.07,12031.5 5683.07,11958.24 ; X4.11@5771.65,11484.25 X4.5@5771.65,11562.99 X3.11@5771.65,11789.37 X3.5@5771.65,11868.11 5748.63,11891.13 5748.63,11892.68 5683.07,11958.24
  Bottom Layer w19.68: R542.2@5122.05,12167.32 5122.05,12045.28 5155.51,12011.81 5155.92,12011.81 5171.67,11996.06 R617.2@5206.69,11996.06 ; V27.2@5236.22,11903.54 v1(5328.74,11811.02)
+5V_UM: C15.2 C107.2 C161.1 C163.1 C200.2 C286.1 C287.1 C288.1 C289.1 C290.1 C291.1 D32.16 D33.16 D35.1 D35.3 D37.1 D37.3 D37.5 D37.7 FB3.2 FB58.2 FB63.2 FB64.1 R172.2 R173.2 R218.1 R219.1 R220.1 R221.1 R222.1 R223.1 R512.1 R543.2 R555.2 R560.2 R618.2 V30.1 X2.14 | length 16390.5
  Top Layer w10: v1(4868.11,11456.69) 4870.67,11454.13 D35.3@4870.67,11404.72 ; v1(4970.47,11456.69) 4970.67,11456.5 D35.1@4970.67,11404.72 ; C15.2@5043.31,11576.77 C15.2@5043.31,11578.74
  Top Layer w13.78: 927.86,9266.96 1104.64,9266.96 1133.62,9237.98 1133.62,8689.51 ; C161.1@4255.91,11374.02 4285.43,11403.54 D33.16@4336.81,11403.54 ; FB63.2@4279.53,11513.78 4279.53,11479.53 4336.81,11422.24 D33.16@4336.81,11403.54 ; v1(4344.49,11350.39) 4336.81,11358.07 D33.16@4336.81,11403.54 ; X2.14@4757.87,11789.37 4828.55,11860.05 4992.91,11860.05 5087.55,11765.4 5087.55,11687.94 5086.11,11686.51 5084.15,11686.51 FB64.1@5059.06,11661.42 5059.06,11630.83 5075.71,11614.17 v1@5078.74,11614.17 ; C15.2@5043.31,11578.74 v1@5078.74,11614.17 ; v1(5084.65,11614.17) v1@5078.74,11614.17
  Top Layer w19.68: 927.86,9266.96 758.9,9435.92 758.9,9981.71 947.11,10169.91 1545.46,10169.91 1600.97,10225.41 1600.97,10481.51 1644.59,10525.14 2092.82,10525.14 2141.74,10574.06 2141.74,10759.84 2129.92,10771.65 R555.2@2129.92,10818.9 2217.7,10818.9 2231.63,10832.83 2231.63,10947.12 2128.83,11049.92 2128.83,11247.04 2167.31,11285.52 2998.34,11285.52 3083.26,11200.6 3083.26,11074.45 3168.57,10989.13 3779.84,10989.13 3991.5,11200.79 4183.38,11200.79 ; 1133.62,8689.51 1161.39,8661.74 1327.47,8661.74 1443.13,8546.08 1540.54,8546.08 1560.07,8526.55 1560.07,8524.58 FB3.2@1588.58,8496.06 2002.44,8496.06 2055.74,8549.36 2055.74,8733.46 2069.66,8747.38 2470.93,8747.38 2548.86,8825.32 2548.86,9067 2630.65,9148.78 2968.59,9148.78 2977.28,9157.48 v1(3001.97,9157.48) ; v1(4344.49,11350.39) 4344.49,11291.51 4253.76,11200.79 4183.38,11200.79 ; v1(4466.54,10385.83) 4589.94,10385.83 4687.32,10483.21 4687.32,10729.85 4499.44,10917.74 4414.58,10917.74 4403.7,10906.86 4380.55,10883.7 4347.8,10883.7 4324.65,10906.86 4313.76,10917.74 4261.42,10917.74 4183.38,10995.78 4183.38,11200.79 ; D37.7@5991.14,11165.35 5991.14,11217.52 v1(5994.09,11220.47) ; D37.5@6091.14,11165.35 6091.14,11219.09 v1(6092.52,11220.47) ; D37.3@6191.14,11165.35 6191.14,11216.73 v1(6194.88,11220.47) ; v1(6289.37,11220.47) 6291.14,11218.7 D37.1@6291.14,11165.35
  Mid Layer 1 w19.68: v1(3001.97,9157.48) 2940.58,9096.09 2940.58,8663.75 v1(3045.28,8559.06)
  Bottom Layer w13.78: v1(4344.49,11350.39) 4384.35,11310.53 4648.02,11310.53 4687.01,11349.52 D32.16@4687.01,11403.54 4687.2,11403.73 4692.12,11403.73 4705.71,11417.32 C163.1@4748.03,11417.32 4751.97,11417.32 4791.34,11456.69 v1(4868.11,11456.69) 4868.11,11460.63 4905.51,11498.03 C291.1@4905.51,11500 ; v1(4466.54,10385.83) FB58.2@4466.54,10431.1 ; X2.14@4757.87,11789.37 R618.2@4757.87,12011.81 ; R223.1@4846.46,11500 C291.1@4905.51,11500 ; v1(4970.47,11456.69) 4974.41,11460.63 R222.1@4974.41,11500 C291.1@4905.51,11500 ; C290.1@5033.46,11500 5057.24,11476.23 5121.03,11476.23 5152.56,11507.76 5192.91,11507.76 V30.1@5192.91,11543.31 5192.91,11557.09 5156.25,11593.75 5105.06,11593.75 v1(5084.65,11614.17) 5082.98,11614.17 5073.9,11623.25 5043.31,11623.25 C200.2@5043.31,11637.8 ; C107.2@5820.87,11334.65 5853.2,11302.31 5870.91,11302.31 C289.1@5909.45,11263.78 R221.1@5968.5,11263.78 ; v1(5994.09,11220.47) 5994.09,11236.22 5968.5,11261.81 R221.1@5968.5,11263.78 ; v1(6092.52,11220.47) 6086.61,11226.38 R220.1@6086.61,11263.78 ; v1(6194.88,11220.47) 6203.82,11220.47 6214.57,11231.22 R219.1@6214.57,11263.78 ; v1(6289.37,11220.47) 6284.37,11220.47 6273.62,11231.22 C286.1@6273.62,11263.78 ; R218.1@6332.68,11263.78 C286.1@6273.62,11263.78 ; R221.1@5968.5,11263.78 C288.1@6027.56,11263.78 R220.1@6086.61,11263.78 ; R220.1@6086.61,11263.78 C287.1@6145.67,11263.78 R219.1@6214.57,11263.78 ; R219.1@6214.57,11263.78 C286.1@6273.62,11263.78
  Bottom Layer w19.68: R512.1@3000,8561.02 3043.31,8561.02 v1(3045.28,8559.06) ; R173.2@3000,9112.2 v1@3000,9157.48 ; v1(3001.97,9157.48) v1@3000,9157.48 ; R560.2@3031.5,9338.58 3031.5,9230.32 3001.97,9200.79 R172.2@3000,9200.79 v1@3000,9157.48 ; X2.14@4757.87,11789.37 4925.2,11956.69 R543.2@4925.2,12167.32 ; v1(4970.47,11456.69) 5008,11456.69 5033.46,11482.16 C290.1@5033.46,11500 ; V30.1@5192.91,11507.76 5192.91,11454 5235.08,11411.84 5799.46,11411.84 5820.87,11390.43 C107.2@5820.87,11334.65
+5VD: C49.2 C309.1 D26.4 FB1.1 FB2.1 FB4.2 FB6.1 FB10.2 FB12.1 FB16.1 FB17.1 FB19.2 FB23.1 FB26.1 FB27.1 FB29.2 FB31.1 FB35.1 FB36.1 FB37.1 FB38.1 FB39.2 FB41.1 FB42.1 FB43.2 FB46.2 FB47.1 FB60.2 FB62.1 FB69.2 FB71.2 R142.2 R143.2 R147.2 R149.2 R168.1 R471.1 R545.2 R547.2 R550.2 R557.2 R721.2 TP23.1 V12.2 | length 30970.9
  Top Layer w10: v1(3242.13,7657.48) 3383.14,7798.5 3503.19,7798.5 3586.88,7882.18 3586.88,7974.67 v1(3604.33,7992.13) ; v1(3679.13,8625.98) 3679.13,8622.05 3681.1,8620.08 FB47.1@3681.1,8580.71
  Top Layer w13.78: v1(1450.79,8834.65) 1462.6,8846.46 FB4.2@1505.91,8846.46 ; v1(1498.03,10118.11) 1498.03,10093.43 1505.91,10085.55 FB6.1@1505.91,9933.07 ; FB39.2@4525.59,5618.11 4561.02,5618.11 v1(4580.71,5598.43) ; FB26.1@5332.68,6582.68 5334.65,6582.68 5366.14,6551.18 v1(5368.11,6551.18) ; v1(5899.61,7622.05) 5906.98,7629.42 5923.73,7629.42 5948.82,7604.33 FB23.1@5948.82,7602.36
  Top Layer w19.68: FB42.1@746.06,10096.46 787.4,10096.46 v1(809.06,10118.11) ; FB2.1@1671.26,8059.06 v1(1718.5,8059.06) ; v1(3679.13,8625.98) 3751.97,8698.82 3924.41,8698.82 3930.94,8705.35 3954.1,8728.5 3986.85,8728.5 4010,8705.35 4016.53,8698.82 4094.39,8698.82 4385.26,8989.68 4911.55,8989.68 4956.35,8944.88 FB46.2@5000,8944.88 5000,8980.52 5047.15,9027.67 5347.86,9027.67 5500.99,8874.54 5500.99,8672.25 5423.23,8594.49 5423.23,8547.24 R557.2@5456.69,8547.24 5566.05,8547.24 5664.48,8448.82 v1(6124.02,8448.82) ; FB1.1@4722.44,10903.54 4750.96,10875.03 4752.92,10875.03 4756.72,10871.23 5342.31,10871.23 5595.43,10618.11 FB60.2@5679.13,10618.11 5679.13,10244.83 5846.46,10077.51 5846.46,9287.17 5877.73,9255.91 R168.1@5929.13,9255.91 6260.9,9255.91 6298.56,9218.24 6299.47,9218.24 v1(6316.93,9200.79) ; v1(4816.93,5500) 4917.77,5500 5256.36,5161.41 5427.16,5161.41 5464.57,5198.82 5571.17,5198.82 5614.02,5241.67 5614.02,5260.47 5637.17,5283.62 5655.97,5283.62 5817.23,5444.88 v1(5883.86,5444.88) ; v1(5230.31,7220.47) 5253.94,7196.85 FB19.2@5417.32,7196.85 5606.71,7196.85 5948.82,7538.96 FB23.1@5948.82,7602.36 ; v1(5368.11,6551.18) 5395.83,6578.9 5429.62,6578.9 5447.01,6561.51 5457.34,6551.18 5519.49,6551.18 5575.87,6494.81 5575.87,6160.55 5698.39,6038.03 5698.39,6008.3 v1(5722.44,5984.25) 5690.94,5952.76 FB27.1@5618.11,5952.76
  Mid Layer 1 w13.78: v1(1450.79,8834.65) 1450.79,8875.19 1547.56,8971.96 1547.56,10040.04 1498.03,10089.57 v1(1498.03,10118.11)
  Mid Layer 1 w19.68: v1(3604.33,7992.13) 3679.13,8066.93 v1(3679.13,8625.98) ; v1(5230.31,7220.47) 5230.31,7137.38 5404.48,6963.22 5404.48,6888.73 5295.76,6780.01 5295.76,6623.53 v1(5368.11,6551.18) ; v1(6124.02,8448.82) 6194.25,8448.82 6302.99,8557.56 6302.99,8567.55 6326.15,8590.71 6338.35,8602.91 6338.35,8820.31 6383.63,8865.59 6383.63,9134.09 v1(6316.93,9200.79)
  Mid Layer 1 w29.53: v1(1990.16,4840.55) 2074.78,4755.93 2620.06,4755.93 2766.22,4609.77 ; v1(2572.83,3696.85) 2513.87,3696.85 2492.99,3717.73 2492.99,4336.54 2557.04,4400.59 2572.17,4400.59 2593.5,4421.92 2593.5,4437.05 2766.22,4609.77 ; v1(4580.71,5598.43) 4579.75,5597.47 4441.85,5597.47 4126.34,5281.95 4126.34,4860.3 4025.88,4759.84 v1(3702.76,4759.84) 3482.6,4759.84 3478.92,4759.84 3350.28,4759.84 3317.8,4727.36 3269.02,4727.36 3261.15,4719.49 3187.67,4719.49 3166.34,4740.82 3153.56,4753.6 2910.05,4753.6 2766.22,4609.77
  Mid Layer 2 w19.68: v1(1718.5,8059.06) 1718.5,8032.4 1730.32,8020.59 v1(1730.32,7759.84) 2559.06,7759.84 2649.57,7669.33 3203.62,7669.33 3215.47,7657.48 v1(3242.13,7657.48) ; v1(1718.5,10118.11) 1775.25,10174.86 2620.66,10174.86 2663.39,10132.13 v1(2663.39,10062.99) ; v1(2242.13,11358.27) 2242.13,11331.61 2247.3,11326.45 2247.3,10798.97 2257.87,10788.39 TP23.1@2257.87,10687.01 ; v1(4702.76,5500) 4739.17,5463.58 4799.4,5463.58 4816.93,5481.11 v1(4816.93,5500) ; v1(5009.84,7129.92) 5054.38,7129.92 5144.94,7220.47 v1(5230.31,7220.47) ; v1(5588.58,7622.05) v1(5899.61,7622.05) v1(6167.32,7622.05)
  Bottom Layer w10: FB41.1@4761.81,7015.75 4786.9,7040.84 4788.87,7040.84 4788.87,7042.81 4804.06,7057.99 4967.82,7057.99 4976.38,7066.55 4976.38,7096.46 v1(5009.84,7129.92) ; v1(5722.44,5984.25) 5746.06,5960.63 5746.06,5616.95 5883.86,5479.15 v1(5883.86,5444.88)
  Bottom Layer w13.78: v1(1450.79,8834.65) 1450.79,8852.36 FB17.1@1490.16,8891.73 ; v1(3242.13,7657.48) 3244.09,7655.51 FB69.2@3287.4,7655.51 ; v1(3702.76,4759.84) 3704.72,4761.81 FB35.1@3750,4761.81 ; FB12.1@4734.25,5627.95 4734.25,5595.34 4768.33,5561.26 4768.33,5548.6 v1(4816.93,5500) ; FB10.2@5673.23,6005.91 5673.23,6003.94 5698.32,5978.85 5717.04,5978.85 v1(5722.44,5984.25) ; v1(6124.02,8448.82) FB43.2@6165.35,8448.82 6165.35,8446.85 6397.64,8214.57 R147.2@6397.64,7881.89 6167.32,7651.57 v1(6167.32,7622.05)
  Bottom Layer w19.68: v1(809.06,10118.11) 1115.99,10118.11 1172.17,10174.29 1468.21,10174.29 1498.03,10144.48 v1(1498.03,10118.11) v1(1718.5,10118.11) 1718.5,10061.02 1716.54,10059.06 R471.1@1716.54,10021.65 ; FB17.1@1490.16,8891.73 1544.18,8837.71 1544.18,8686.17 1625.25,8605.1 1625.25,8580.01 1718.5,8486.76 v1(1718.5,8059.06) ; v1(1730.32,7759.84) 1730.32,7730.31 1721.32,7721.32 1721.32,7544.45 1787.42,7478.35 FB71.2@1889.76,7478.35 ; C309.1@2151.57,11454.72 2196.67,11454.72 2220.71,11430.68 2220.71,11429.88 V12.2@2245.08,11405.51 ; v1(2242.13,11358.27) 2245.08,11361.22 V12.2@2245.08,11405.51 ; D26.4@2367.32,11631.89 2367.32,11579.33 2354.33,11566.34 R721.2@2354.33,11513.78 ; C49.2@2444.88,11460.63 2444.88,11462.6 2393.7,11513.78 R721.2@2354.33,11513.78 ; R149.2@2661.42,10021.65 2661.42,10061.02 v1(2663.39,10062.99) ; R545.2@3527.56,7976.38 3591.61,7976.38 3604.33,7989.09 v1(3604.33,7992.13) ; R143.2@5190.94,7267.72 5190.94,7265.75 5230.31,7226.38 v1(5230.31,7220.47) ; v1(5588.58,7622.05) v1@5589.57,7622.05 ; R142.2@5588.58,7665.35 5588.58,7623.03 v1@5589.57,7622.05 ; R547.2@5594.49,7562.99 5594.49,7617.13 v1@5589.57,7622.05 ; V12.2@2245.08,11405.51 2245.08,11436.79 2257.76,11449.46 2336.7,11449.46 2354.33,11467.09 R721.2@2354.33,11513.78
  Bottom Layer w29.53: FB37.1@1946.85,4830.71 1989.17,4830.71 1990.16,4831.69 v1(1990.16,4840.55) 2017.22,4867.61 2032.97,4867.61 2064.96,4899.61 FB31.1@2066.93,4899.61 2066.93,4948.82 1980.81,5034.93 1978.84,5034.93 FB38.1@1946.85,5066.93 ; R550.2@2257.87,10809.06 TP23.1@2257.87,10687.01 2317.99,10687.01 2331.77,10700.79 FB62.1@2366.14,10700.79 2472.72,10700.79 2586.47,10587.03 2586.47,10223.45 2663.39,10146.53 v1(2663.39,10062.99) ; FB36.1@2572.83,3653.54 v1(2572.83,3696.85) ; FB29.2@4535.43,5598.43 v1(4580.71,5598.43) 4580.71,5546.02 4626.73,5500 v1(4702.76,5500) 4702.76,5393.7 FB16.1@4763.78,5332.68
+15V: FB66.2 FB67.2 FB68.2 FB70.2 FB72.2 R468.1 R553.2 R722.1 R723.2 | length 8792.9
  Top Layer w19.68: v1(1958.66,11393.7) 1990.88,11393.7 1992.14,11394.96 2335.3,11394.96 2363.21,11367.04 3021.49,11367.04 3183.07,11528.63 R722.1@3183.07,12090.55
  Top Layer w29.53: v1(828.74,10212.6) 830.71,10214.57 FB72.2@830.71,10259.84
  Mid Layer 1 w29.53: v1(1805.12,10066.93) 1805.12,9757.2 2072.21,9490.11 2072.21,8442.29 1994.49,8364.56 1994.49,8076.36 2036.24,8034.61 2079.43,8034.61 2105.47,8008.57 2105.47,7971.75 2104.33,7970.6 2104.33,7965.51 v1(2104.33,7496.06)
  Mid Layer 2 w19.68: v1(1805.12,10066.93) 1831.77,10066.93 1853.65,10045.05 2160.54,10045.05 2179.74,10025.85 2689.24,10025.85 v1(2730.32,10066.93)
  Bottom Layer w13.78: FB70.2@1956.69,7330.71 1958.66,7330.71 2024.12,7396.17 2026.09,7396.17 2051.18,7421.26 FB66.2@2051.18,7423.23 ; FB67.2@3438.5,7423.23 3467.77,7423.23 3492.13,7447.59 ; FB68.2@3492.13,7517.72 3492.13,7447.59 ; v1@3553.15,7440.48 3501.87,7440.48 3494.77,7447.59 3492.13,7447.59
  Bottom Layer w19.68: v1(1958.66,11393.7) 1958.66,11293.06 1884.5,11218.9 1884.5,10904.87 1960.63,10828.74 R553.2@1982.28,10828.74 ; FB66.2@2051.18,7423.23 2051.18,7425.2 2082.68,7456.69 v1(2104.33,7456.69) ; R723.2@2730.32,10021.65 v1(2730.32,10066.93)
  Bottom Layer w29.53: v1(828.74,10212.6) 1562.12,10212.6 1686.58,10337.06 1747.76,10337.06 ; R468.1@1805.12,10021.65 v1(1805.12,10066.93) 1805.12,10279.7 1747.76,10337.06 ; R553.2@1982.28,10828.74 2051.18,10828.74 2091.83,10788.09 2091.83,10662.14 1766.75,10337.06 1747.76,10337.06
  other v1: 3553.15,7425.2 3553.15,7464.57
+U_AMP: D77.1 D77.2 X15.1 X15.3 X16.1 X16.3
+U_POWER: C9.2 C318.2 L16.2 R639.2 R679.2 R693.2 R694.2 R695.2 R696.2 R697.2 R698.2 R699.2 R700.2 R701.2 R702.2 R703.2 R704.2 TP31.1 TP32.1 V51.1 V57.3 V61.1 | length 418.7
  Bottom Layer w10: V61.1@1992.13,4450.79 1992.13,4383.86 2001.97,4374.02 C9.2@2001.97,4324.8
  Bottom Layer w19.68: V57.3@948.82,5206.3 1058.66,5206.3 1086.61,5234.25 R679.2@1127.95,5234.25 1127.95,5168.31 V51.1@1105.32,5145.67
  other v1: 1301.18,4086.61 1368.11,4086.61 1446.85,4086.61 1521.65,4086.61 1600.39,4086.61 1690.94,4086.61 1789.37,4086.61
  other v2: 683.07,6488.19 690.94,7133.86
+U_UM: C249.2 C280.2 R418.2 V28.2 X27.1 X27.2 X27.3 X27.4 | length 179.9
  Bottom Layer w10: v1(80.71,11303.15) 98.16,11320.6 98.16,11332.57 98.27,11332.68 V28.2@110.24,11332.68 ; v1(80.71,11362.2) V28.2@110.24,11332.68 ; v1(112.2,11334.65) V28.2@112.2,11332.68 ; v1(143.7,11303.15) V28.2@114.17,11332.68 ; v1(143.7,11362.2) V28.2@114.17,11332.68 ; V28.2@110.24,11332.68 V28.2@112.2,11332.68 ; V28.2@112.2,11332.68 V28.2@114.17,11332.68
+U_VENT: C250.2 C274.1 C275.1 L1.4 L2.1 L7.1 L11.1 R576.1 X30.1 X30.2 X30.3 | length 74.6
  Bottom Layer w19.68: R576.1@427.17,12316.93 427.17,12298.96 478.6,12298.96 v1(482.28,12295.28)
  other v1: 746.06,12094.49
-5V: FB8.1 FB14.1 FB22.1 FB25.1 FB33.1 FB78.2 R144.2 R146.2 R150.2 R467.1 R552.2 R728.2 | length 14142.4
  Top Layer w10: 6328.61,7980.31 R146.2@6397.64,7980.31
  Top Layer w13.78: FB8.1@1568.9,10001.97 1568.9,10062.99 R728.2@1714.57,10208.66 ; v1(5340.55,6665.35) 5366.14,6665.35 5370.08,6661.42 FB25.1@5403.54,6661.42 ; v1(6057.09,7539.37) 6081.21,7563.49 6081.21,7575.3 6106.3,7600.39 FB22.1@6106.3,7602.36 6106.3,7604.33 6172.24,7670.28 6172.24,7823.95 6328.61,7980.31
  Top Layer w19.68: R728.2@1714.57,10208.66 R728.2@1736.22,10208.66 ; v1(2612.2,10066.93) 2612.2,10042.24 2626.14,10028.31 2972.13,10028.31 3171.26,10227.44 v1(3171.26,10338.58) 3173.23,10340.55 FB78.2@3173.23,10387.8 ; v1(3576.77,10338.58) 3632.49,10338.58 3646.41,10324.66 3646.41,9294.31 3781.47,9159.25 4844.02,9159.25 4942.92,9060.35 5362.85,9060.35 5533.93,8889.27 5533.93,8745.39 5791.78,8487.54 6193.34,8487.54 6397.64,8283.23 R146.2@6397.64,7980.31 ; v1(4820.87,5547.24) 4926.11,5547.24 4972.25,5593.39 4972.25,5875.8 v1(4994.09,5897.64)
  Top Layer w29.53: R728.2@1736.22,10208.66 1757.87,10208.66 1848.43,10118.11 v1(1895.67,10118.11)
  Mid Layer 2 w19.68: v1(1895.67,10118.11) 2513.23,10118.11 2531.3,10100.04 2579.1,10100.04 v1(2612.2,10066.93) ; v1(3171.26,10338.58) 3242.52,10267.33 3372.27,10267.33 3443.53,10338.58 v1(3576.77,10338.58) ; 4279.05,5520.84 4397.52,5520.84 4398.75,5522.06 4627.86,5522.06 4628.28,5522.48 4630.63,5522.48 4679.01,5570.87 4760.19,5570.87 4783.81,5547.24 v1(4820.87,5547.24) ; v1(4994.09,5897.64) 4994.09,6020.7 5093.32,6119.92 5094.97,6119.92 5112.36,6137.31 5112.36,6138.97 5115.2,6141.8 5115.2,6197.45 5171.25,6253.5 5238.88,6253.5 5419.77,6434.38 5419.77,6509.67 5429.62,6519.53 5447.01,6536.92 5447.01,6561.51 5373.68,6634.84 5373.68,6676.77 5362.82,6687.63 ; v1(5340.55,6665.35) 5362.82,6687.63 ; v1(5588.58,6811.02) 5522.88,6745.32 5420.52,6745.32 5362.82,6687.63
  Mid Layer 2 w29.53: v1(3427.17,5488.19) 3641.14,5488.19 3692.77,5436.57 4194.78,5436.57 4279.05,5520.84
  Bottom Layer w13.78: v1(3427.17,5488.19) 3433.07,5494.09 FB33.1@3433.07,5529.53 ; v1(4820.87,5547.24) 4842.52,5568.9 FB14.1@4862.2,5568.9 ; R144.2@5259.84,7267.72 5259.84,7235.16 5276.73,7218.27 5444.15,7218.27 5588.58,7073.84 v1(5588.58,6811.02)
  Bottom Layer w19.68: R467.1@1893.7,10021.65 1893.7,10086.61 1895.67,10088.58 v1(1895.67,10118.11) ; R150.2@2592.52,10021.65 2592.52,10032.59 2613.13,10053.19 2613.13,10066.01 v1(2612.2,10066.93) ; 2662.33,10338.58 v1(3171.26,10338.58) ; R144.2@5259.84,7267.72 5350.46,7267.72 5374.24,7291.5 5723.05,7291.5 5970.92,7539.37 v1(6057.09,7539.37)
  Bottom Layer w29.53: R552.2@2405.51,10809.06 2427.17,10809.06 2467.49,10768.73 2468.84,10768.73 2634.17,10603.4 2634.17,10366.74 2662.33,10338.58
-U_AMP: C4.1 C6.1 C7.1 C11.1 C12.1 L13.3 R638.1 X15.2 X15.4 X16.2 X16.4 | length 871.6
  Top Layer w39.37: v1(5100.39,5149.61) 5100.39,4952.48 5115.69,4937.18 5115.69,4936.49
  Bottom Layer w39.37: C6.1@4944.88,4452.76 4986.25,4452.76 4986.25,4509.84 5049.21,4572.81 C7.1@5049.21,4653.54 ; R638.1@5045.28,5145.67 5049.21,5149.61 v1(5100.39,5149.61)
  Bottom Layer w59.06: C7.1@5049.21,4653.54 5049.21,4701.06 5050.37,4702.22 5050.37,4709.82 5102.36,4761.81 5200.79,4761.81 C12.1@5299.21,4761.81
-U_UM: C249.1 C280.1 L1.2 R418.1 TP25.1 V29.2 X27.5 X27.6 X27.7 X27.8 | length 149.9
  Top Layer w39.37: 397.54,11686.38 402.82,11681.1 TP25.1@545.28,11681.1
-U_VENT: C250.1 C274.2 C275.2 H17.2 L1.3 L6.1 L8.1 L10.1 X30.4 X30.5 X30.6 | length 65
  Top Layer w19.68: v1(375.98,12362.2) 389.76,12362.2 423.23,12328.74 H17.2@427.17,12328.74
  other v1: 620.08,10885.83 620.08,10960.63 781.5,11409.45 828.74,11409.45 781.5,11448.82 828.74,11448.82 899.61,12003.94 899.61,12098.43